# Altium PCB Atrium_Charging_Case.PcbDoc
Units mm, origin at the board's own origin, x right, y up, seen from the top; angles counter-clockwise.
Board outline 47.2 x 34.93 mm, 2 copper layers (Top Layer, Bottom Layer), stack 0.78 mm thick; 59 components, 41 nets, 194 pads, 115 vias.
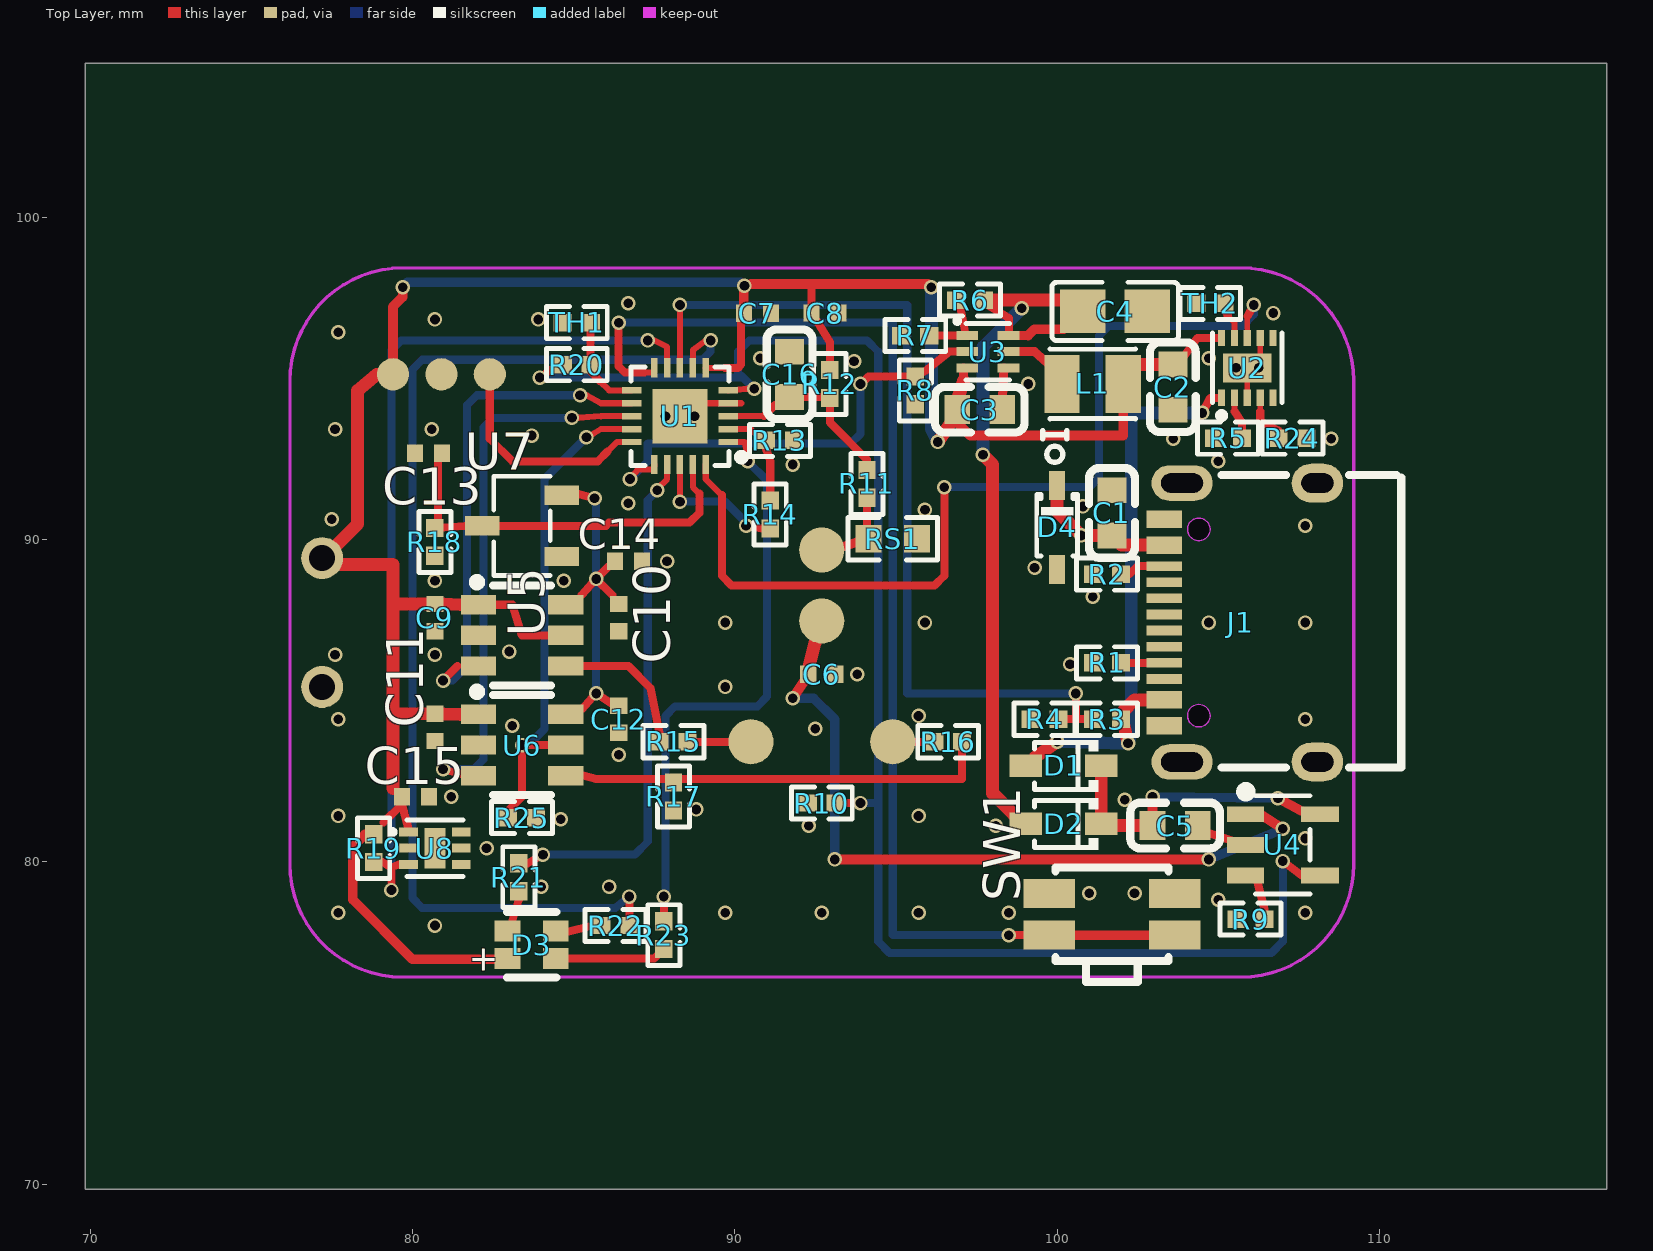
[diagram p0: Top Layer view]
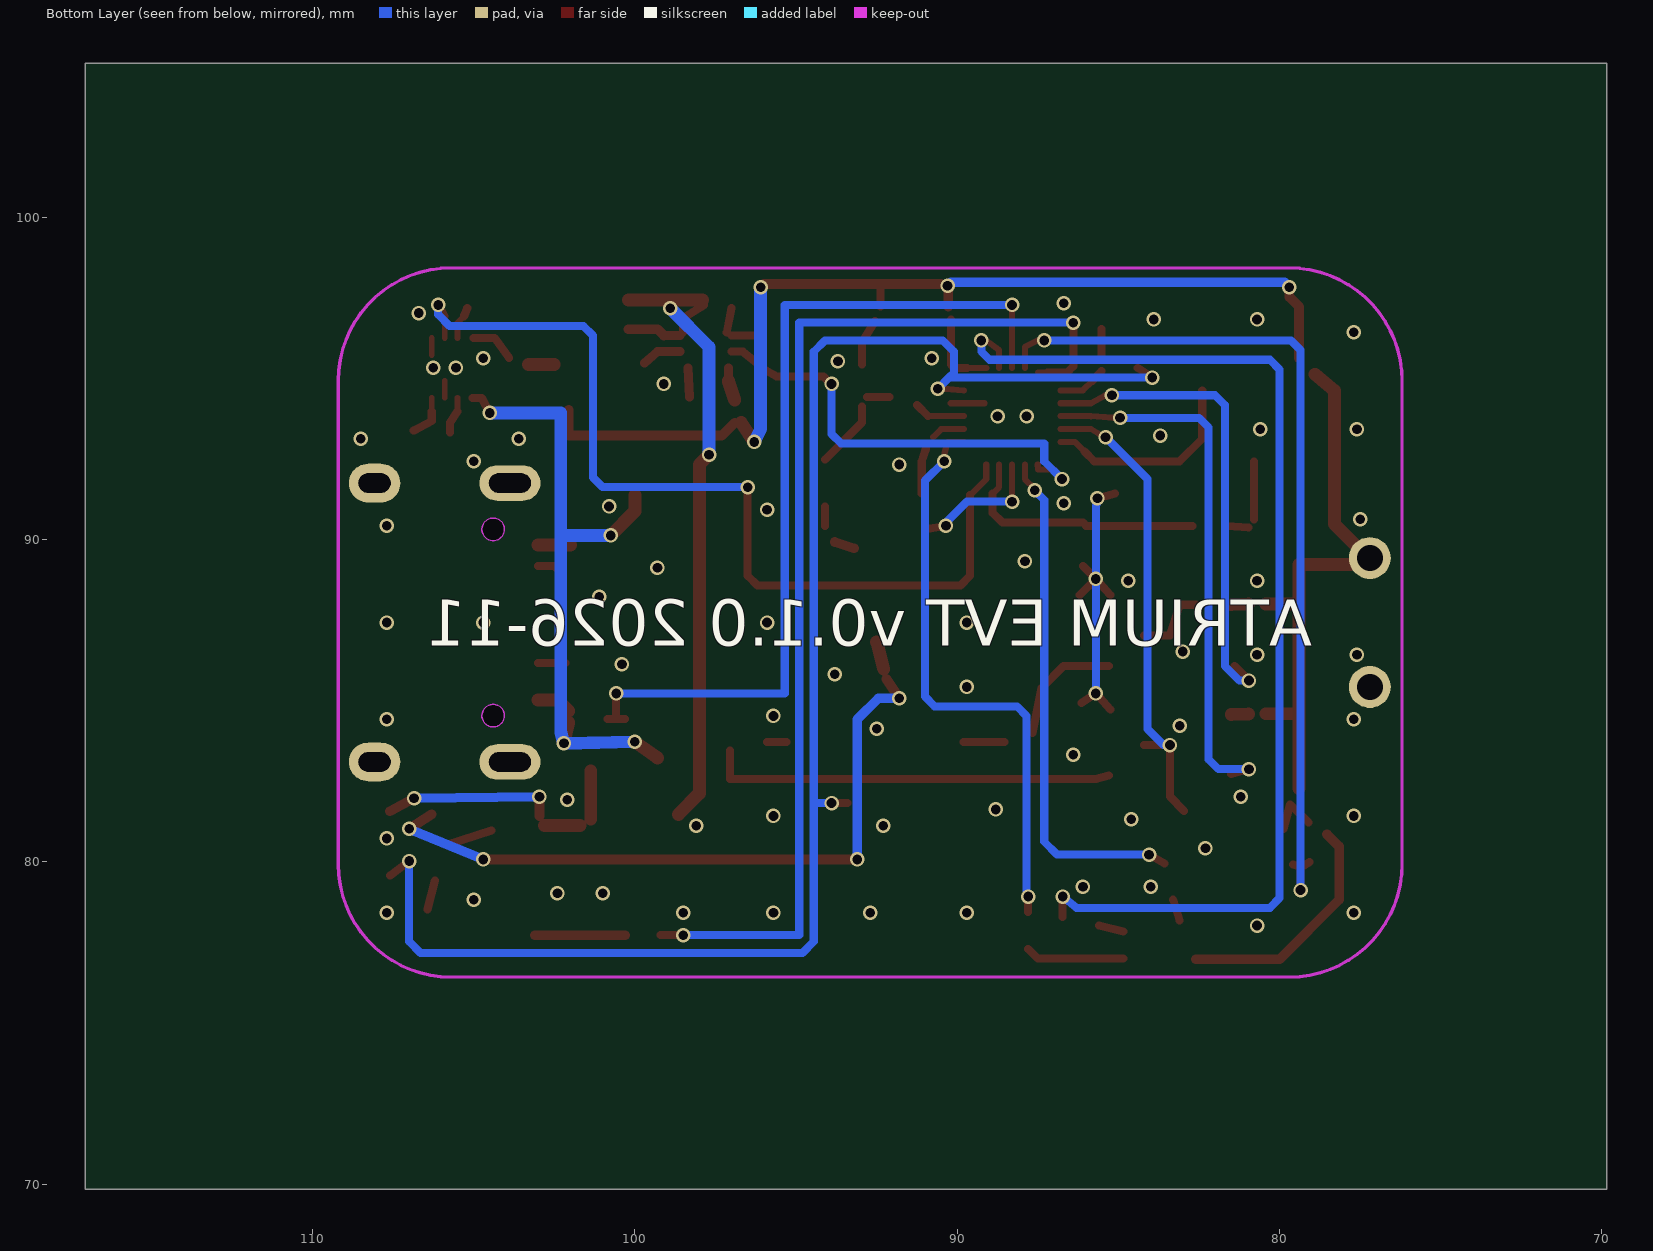
[diagram p1: Bottom Layer view, seen from below]

## Layer stack, top to bottom
Top Solder Mask Layer: solder mask 0.01, Dk 3.3
Top Layer: signal copper 0.035
Dielectric1: surface 0.71, FR4, Dk 4.5
Bottom Layer: signal copper 0.035
Bottom Solder Mask Layer: solder mask 0.01, Dk 3.3

## Board outline
117.051,69.85 69.85,69.85 69.85,104.775 117.051,104.775

## Design rules (kind name [scope] priority, off if disabled: settings)
BoardOutlineClearance copperThickness1oz [All] p0: genericclearance=0.254 ignorepadtopadclearanceinfootprint=FALSE except(0: Arc-SplitContinuation Track-SplitContinuation SMDPad-SplitContinuation THPad-SplitContinuation Via-SplitContinuation Fill-SplitContinuation Poly-SplitContinuation Region-SplitContinuation Text-SplitContinuation)
BoardOutlineClearance copperThickness2oz [All] p0: genericclearance=0.254 ignorepadtopadclearanceinfootprint=FALSE except(0: Arc-SplitContinuation Track-SplitContinuation SMDPad-SplitContinuation THPad-SplitContinuation Via-SplitContinuation Fill-SplitContinuation Poly-SplitContinuation Region-SplitContinuation Text-SplitContinuation)
BoardOutlineClearance otherClearance [All] p0: genericclearance=0.254 ignorepadtopadclearanceinfootprint=FALSE except(0: Arc-SplitContinuation Track-SplitContinuation SMDPad-SplitContinuation THPad-SplitContinuation Via-SplitContinuation Fill-SplitContinuation Poly-SplitContinuation Region-SplitContinuation Text-SplitContinuation)
Clearance copperThickness1oz [All] p1: gap=0.178 ignorepadtopadclearanceinfootprint=FALSE
Clearance copperThickness2oz [All] p1: gap=0.178 ignorepadtopadclearanceinfootprint=FALSE
Clearance otherClearance [All] p1: gap=0.178 ignorepadtopadclearanceinfootprint=FALSE
DiffPairsRouting differentialPair [All] p1: maxuncoupledlength=10 minlimit=6 maxlimit=Infinity mostfreqgap=6 toplayer_minwidth=5 toplayer_prefwidth=10 toplayer_maxwidth=100 bottomlayer_minwidth=5 bottomlayer_prefwidth=10 bottomlayer_maxwidth=100
PasteMaskExpansion pasteMaskExpansion [All] p1: expansion=0
PlaneConnect innerPlane [All] p1: planeconnectstyle=Relief reliefexpansion=0.508 reliefentries=4 reliefconductorwidth=0.15 reliefairgap=0.15
PolygonConnect copperRegion [All] p1: connectstyle=Direct reliefentries=4 reliefconductorwidth=10 polygonreliefangle="90 Angle" airgapwidth=10
RoutingVias viaSize [All] p1: viastyle="Through Hole" holewidth=7.874 minholewidth=7.874 maxholewidth=248.0314 width=7.874 minwidth=7.874 maxwidth=248.0314
SolderMaskExpansion solderMaskExpansion [IsVia] p1: useseparateexpansions=TRUE expansion=-1000 expansionbottom=-1000
SolderMaskExpansion solderMaskExpansion [All] p2: useseparateexpansions=TRUE expansion=2 expansionbottom=2
Width copperThickness1oz [All] p1: maxlimit=100 minlimit=6 preferedwidth=6
Width copperThickness2oz [All] p1: maxlimit=100 minlimit=8 preferedwidth=10

## Components (designator, comment, footprint, x,y, rotation, side; value= is the part's Value field where it differs from the comment)
C1 "10uF" C0603 101.701,90.826 r90 top
C2 "4.7uF" C0603 103.59,94.726 r270 top
C3 "10uF" C0603 97.6,94.025 r0 top
C4 "22uF" C0805 101.8,97.075 r0 top
C5 "10uF" C0603 103.66,81.126 r0 top
C6 "1uF" C0402 92.7,85.825 r0 top
C7 "100nF" C0402 90.7,97.025 r0 top
C8 "1uF" C0402 92.8,97.025 r0 top
C9 "100nF" C0402 80.7,87.576 r270 top
C10 "100nF" C0402 86.401,87.575 r270 top
C11 "100nF" C0402 80.7,84.175 r270 top
C12 "100nF" C0402 86.399,84.424 r270 top
C13 "1uF" C0402 80.501,92.676 r180 top
C14 "1uF" C0402 86.7,89.327 r0 top
C15 "100nF" C0402 80.1,82.025 r0 top
C16 "100pF" C0603 91.7,95.125 r90 top
D1 "1N5819WS" SOD-323_L1.8-W1.3-LS2.5-RD 100.2,82.975 r180 top
D2 "1N5819WS" SOD-323_L1.8-W1.3-LS2.5-RD 100.2,81.176 r180 top
D3 "XL-1615RGBC-RF" LED-ARRAY-SMD_4P-L1.6-W1.5-BR_XL-1615RGBC-RF 83.7,77.425 r180 top
D4 "TSD05DYFR" SOD-323_L1.7-W1.3-LS2.6_DYF0002A 100.001,90.375 r270 top
J1 "TYPE-C 16PIN 2MD(073)" USB-C-SMD_TYPE-C-16PIN-2MD-073 105.7,87.425 r90 top
L1 "1uH" IND-SMD_L2.5-W2.0_WPN252012H 101.1,94.825 r180 top
R1 "5.1kΩ" R0402 101.55,86.175 r180 top
R2 "5.1kΩ" R0402 101.55,88.925 r180 top
R3 "2.2kΩ" R0402 101.55,84.425 r180 top
R4 "2.2kΩ" R0402 99.61,84.425 r180 top
R5 "2.7kΩ" R0402 105.301,93.145 r180 top
R6 "768kΩ" R0402 97.3,97.426 r180 top
R7 "100kΩ" R0402 95.6,96.326 r180 top
R8 "1MΩ" R0402 95.601,94.626 r270 top
R9 "15kΩ" R0402 106,78.224 r180 top
R10 "1MΩ" R0402 92.7,81.826 r180 top
R11 "10kΩ" R0402 94.101,91.726 r90 top
R12 "1.5MΩ" R0402 92.949,94.825 r270 top
R13 "1kΩ" R0402 91.401,93.074 r0 top
R14 "20kΩ" R0402 91.099,90.775 r270 top
R15 "100Ω" R0402 88.1,83.726 r0 top
R16 "100Ω" R0402 96.62,83.726 r180 top
R17 "1MΩ" R0402 88.1,82.026 r270 top
R18 "1MΩ" R0402 80.699,89.926 r270 top
R19 "330kΩ" R0402 78.8,80.426 r270 top
R20 "100kΩ" R0402 85.1,95.424 r0 top
R21 "1kΩ" R0402 83.301,79.525 r270 top
R22 "330Ω" R0402 86.301,78.026 r180 top
R23 "330Ω" R0402 87.799,77.726 r270 top
R24 "2kΩ" R0402 107.3,93.145 r0 top
R25 "100kΩ" R0402 83.399,81.375 r0 top
RS1 "1Ω" R0603 94.9,90.025 r0 top
SW1 "SKSCLAE010" SW-SMD_4P-L3.5-W2.9-P1.30-LS4.8 101.7,78.375 r0 top
TH1 "NCU15WF104F6SRC" R0402 85.1,96.727 r180 top
TH2 "NCP15XH103F03RC" R0402 104.75,97.325 r180 top
U1 "CH32V003F4U6" QFN-20_L3.0-W3.0-P0.40-TL-EP1.7 88.3,93.825 r180 top
U2 "BQ24040DSQR" WSON-10_L2.0-W2.0-P0.40-BL-EP 105.9,95.325 r0 top
U3 "TPS61023DRLR" SOT-563-6_L1.6-W1.2-P0.5-LS1.6-BR 97.851,95.826 r180 top
U4 "SY6280AAC" SOT-23-5_L3.0-W1.7-P0.95-LS2.8-BL 106.995,80.526 r270 top
U5 "SN74LVC1T45DBVR" SOT-23-6_L2.9-W1.6-P0.95-LS2.8-BR 83.4,87.025 r180 top
U6 "SN74LVC1T45DBVR" SOT-23-6_L2.9-W1.6-P0.95-LS2.8-BR 83.4,83.625 r180 top
U7 "XC6206P182MR" SOT-23-3_L2.9-W1.6-P1.90-LS2.8-BR 83.4,90.425 r0 top
U8 "HAL248 SW" DFN-6_HAL248_SW 80.7,80.425 r270 top

## Footprints (in the part's own frame and the unit in brackets; to place one, negate y for a bottom-side part, rotate by r counter-clockwise, add the part's x,y. Pads: shape width x height; smd on the part's side, far side on the other; paste and mask are expansions set on the pad)
C0402 [mm]
  rect 0.5x0.54 smd paste+0 mask+0.051: 1(-0.42,0) 2(0.42,0)
C0603 [mm]
  rect 0.8x0.9 smd: 1(-0.7,0) 2(0.7,0)
  silkscreen extent -1.39,-0.71 1.39,0.71
C0805 [mm]
  rect 1.41x1.35 smd paste-100 mask+0.051: 1(-1,0) 2(1,0)
  silkscreen extent -1.96,-0.9 1.96,0.9
DFN-6_HAL248_SW [mm]
  rect 0.28x0.585 smd paste+0 mask+0.051: 1(-0.5,-0.818) 2(0,0.817) 3(0.5,-0.818) 4(0.5,0.817) 5(0,-0.818) 6(-0.5,0.817)
  rect 1.26x0.65 smd paste+0 mask+0.051: 7(0,0)
  silkscreen extent -0.88,-1.39 0.88,0.88
IND-SMD_L2.5-W2.0_WPN252012H [mm]
  rect 1.1x1.8 smd: 1(-0.95,0) 2(0.95,0)
  silkscreen extent -1.33,-1.09 1.33,1.09
LED-ARRAY-SMD_4P-L1.6-W1.5-BR_XL-1615RGBC-RF [mm]
  rect 0.8x0.65 smd paste+0 mask+0.05: 1(0.75,-0.425) 2(0.75,0.425) 3(-0.75,0.425) 4(-0.75,-0.425)
  silkscreen extent -0.76,-1.02 0.76,1.02
QFN-20_L3.0-W3.0-P0.40-TL-EP1.7 [mm]
  rect 0.6x0.2 smd paste-100 mask+0.051: 1(-1.5,0.8) 2(-1.5,0.4) 3(-1.5,0) 4(-1.5,-0.4) 5(-1.5,-0.8) 11(1.5,-0.8) 12(1.5,-0.4) 13(1.5,0) 14(1.5,0.4) 15(1.5,0.8)
  rect 0.2x0.6 smd paste-100 mask+0.051: 6(-0.8,-1.5) 7(-0.4,-1.5) 8(0,-1.5) 9(0.4,-1.5) 10(0.8,-1.5) 16(0.8,1.5) 17(0.4,1.5) 18(0,1.5) 19(-0.4,1.5) 20(-0.8,1.5)
  rect 1.7x1.7 smd paste-100 mask+0.051: 21(0,0)
  silkscreen extent -2,-1.52 1.52,1.52
R0402 [mm]
  rect 0.566x0.54 smd paste-100 mask+0.051: 1(-0.433,0) 2(0.433,0)
  silkscreen extent -0.94,-0.5 0.94,0.5
R0603 [mm]
  rect 0.806x0.864 smd paste-100 mask+0.051: 1(-0.753,0) 2(0.753,0)
  silkscreen extent -1.39,-0.66 1.39,0.66
SOD-323_L1.7-W1.3-LS2.6_DYF0002A [mm]
  rect 0.9x0.5 smd paste+0 mask+0.05: 1(-1.3,0) 2(1.3,0)
  silkscreen extent -3.08,-0.64 0.89,0.64
SOD-323_L1.8-W1.3-LS2.5-RD [mm]
  rect 1x0.7 smd: 1(-1.172,0) 2(1.172,0)
  silkscreen extent -1.08,-0.8 0.9,0.8
SOT-23-3_L2.9-W1.6-P1.90-LS2.8-BR [mm]
  rect 1.07x0.6 smd paste+0 mask+0.051: 1(1.235,-0.95) 2(1.235,0.95) 3(-1.235,0)
  silkscreen extent -0.88,-1.54 0.88,1.54
SOT-23-5_L3.0-W1.7-P0.95-LS2.8-BL [mm]
  rect 0.49x1.157 smd: 1(-0.95,-1.154) 2(0,-1.154) 3(0.95,-1.154)
  rect 0.49x1.175 smd: 4(0.95,1.154) 5(-0.95,1.154)
  silkscreen extent -1.8,-1.29 1.53,0.85
SOT-23-6_L2.9-W1.6-P0.95-LS2.8-BR [mm]
  rect 1.1x0.6 smd paste+0 mask+0.051: 1(1.35,-0.95) 2(1.35,0) 3(1.35,0.95) 4(-1.35,0.95) 5(-1.35,0) 6(-1.35,-0.95)
  silkscreen extent -0.9,-1.78 1.52,1.55
SOT-563-6_L1.6-W1.2-P0.5-LS1.6-BR [mm]
  rect 0.68x0.28 smd: 1(0.64,-0.5) 2(0.64,0) 3(0.64,0.5) 4(-0.64,0.5) 5(-0.64,0) 6(-0.64,-0.5)
  silkscreen extent -0.68,-1.02 1.02,0.88
SW-SMD_4P-L3.5-W2.9-P1.30-LS4.8 [mm]
  rect 1.6x0.9 smd: 1(-1.95,-0.65) 2(1.95,-0.65) 3(-1.95,0.65) 4(1.95,0.65)
  silkscreen extent -1.75,-2.1 1.75,1.45
USB-C-SMD_TYPE-C-16PIN-2MD-073 [mm]
  oval 1.2x1.6 hole 0.6 slot 1 at 90 deg paste+0 mask+0.05: 13(-4.325,-2.375) 14(4.325,-2.375)
  oval 1.1x1.9 hole 0.6 slot 1.3 at 90 deg paste+0 mask+0.05: 13(-4.325,1.825) 14(4.325,1.825)
  rect 0.55x1.1 smd paste+0 mask+0.05: A1B12(-3.2,2.375) A4B9(-2.4,2.375) B1A12(3.2,2.375) B4A9(2.4,2.375)
  rect 0.3x1.1 smd paste+0 mask+0.05: A5(-1.25,2.375) A6(-0.25,2.375) A7(0.25,2.375) A8(1.25,2.375) B5(1.75,2.375) B6(0.75,2.375) B7(-0.75,2.375) B8(-1.75,2.375)
  Board Outline Layer circle w0.003: c-2.89,1.305 r0.35
  Board Outline Layer circle w0.003: c2.89,1.305 r0.35
  Board Outline Layer region: -2.89,0.955 -3.042,0.99 -3.164,1.087 -3.231,1.227 -3.231,1.383 -3.164,1.523 -3.042,1.62 -2.89,1.655 -2.89,1.655 -2.738,1.62 -2.616,1.523 -2.549,1.383 -2.549,1.227 -2.616,1.087 -2.738,0.99 -2.89,0.955
  Board Outline Layer region: -2.89,0.955 -2.968,0.964 -3.042,0.99 -3.108,1.031 -3.164,1.087 -3.205,1.153 -3.231,1.227 -3.24,1.305 -3.231,1.383 -3.205,1.457 -3.164,1.523 -3.108,1.579 -3.042,1.62 -2.968,1.646 -2.89,1.655 -2.812,1.646 -2.738,1.62 -2.672,1.579 -2.616,1.523 -2.575,1.457 -2.549,1.383 -2.54,1.305 -2.549,1.227 -2.575,1.153 -2.616,1.087 -2.672,1.031 -2.738,0.99 -2.812,0.964
  Board Outline Layer region: 2.89,0.955 2.738,0.99 2.616,1.087 2.549,1.227 2.549,1.383 2.616,1.523 2.738,1.62 2.89,1.655 2.89,1.655 3.042,1.62 3.164,1.523 3.231,1.383 3.231,1.227 3.164,1.087 3.042,0.99 2.89,0.955
  Board Outline Layer region: 2.89,0.955 2.812,0.964 2.738,0.99 2.672,1.031 2.616,1.087 2.575,1.153 2.549,1.227 2.54,1.305 2.549,1.383 2.575,1.457 2.616,1.523 2.672,1.579 2.738,1.62 2.812,1.646 2.89,1.655 2.968,1.646 3.042,1.62 3.108,1.579 3.164,1.523 3.205,1.457 3.231,1.383 3.24,1.305 3.231,1.227 3.205,1.153 3.164,1.087 3.108,1.031 3.042,0.99 2.968,0.964
  Multi-Layer board cut-out: -2.89,0.955 -3.042,0.99 -3.164,1.087 -3.231,1.227 -3.231,1.383 -3.164,1.523 -3.042,1.62 -2.89,1.655 -2.89,1.655 -2.738,1.62 -2.616,1.523 -2.549,1.383 -2.549,1.227 -2.616,1.087 -2.738,0.99 -2.89,0.955
  Multi-Layer board cut-out: 2.89,0.955 2.738,0.99 2.616,1.087 2.549,1.227 2.549,1.383 2.616,1.523 2.738,1.62 2.89,1.655 2.89,1.655 3.042,1.62 3.164,1.523 3.231,1.383 3.231,1.227 3.164,1.087 3.042,0.99 2.89,0.955
  silkscreen extent -4.5,-4.97 4.57,0.6
WSON-10_L2.0-W2.0-P0.40-BL-EP [mm]
  rect 0.224x0.505 smd: 1(-0.8,-0.928) 2(-0.4,-0.928) 3(0,-0.928) 4(0.4,-0.928) 5(0.8,-0.928) 6(0.8,0.928) 7(0.4,0.928) 8(0,0.928) 9(-0.4,0.928) 10(-0.8,0.928)
  rect 1.5x0.9 smd: 11(0,0)
  silkscreen extent -1.08,-1.58 1.08,1.08

## Free pads (board coordinates)
  round 1.3 hole 0.8: BT1(77.2,89.425) BT2(77.2,85.425)
  round 1.4 smd: P1(92.7,87.475) P2(92.7,89.675) P3(94.9,83.725) P4(90.5,83.725)
  round 1.001 smd paste+0 mask+0.051: TP1(82.4,95.125)
  round 1 smd: TP2(79.4,95.125) TP3(80.9,95.125)

## Via types
v1: diameter 0.45, hole 0.3, Top Layer to Bottom Layer, 115 vias

## Nets (pads, with @x,y where several pads share a name; then routed paths per layer and width w, separated by ;. In a path a pad name is that pad's centre, name@x,y a point inside that pad or via, vN(x,y) a via of type N, cw(c..) or ccw(c..) an arc to the next point about the centre after c; other vN are vias at no path point)
5V_POD: C5.1 D1.1 D2.1 U4.5 | length 7.9
  Top Layer w0.3: C5.1@102.96,81.425 v1(102.96,82.025) ; v1(106.85,81.975) U4.5@107.6,81.575
  Top Layer w0.4: D2.1@101.37,81.325 D1.1@101.37,82.825 ; D2.1@101.7,81.125 C5.1@102.8,81.125
  Bottom Layer w0.3: v1(102.96,82.025) v1(106.85,81.975)
BOOST_EN: R8.1 U1.16 U3.2 | length 14.1
  Top Layer w0.19: v1(86.75,91.875) 87,92.175 87.5,92.175 U1.16
  Top Layer w0.25: v1(93.9,94.825) 94.15,95.055 95.6,95.055 95.9,95.225 96.65,95.825 U3.2@97,95.825
  Bottom Layer w0.25: v1(86.75,91.875) 87.3,92.425 87.3,92.975 93.6,92.975 93.9,93.275 v1(93.9,94.825)
BOOST_FB: R6.2 R7.1 U3.1 | length 1.6
  Top Layer w0.25: R7.1@96.2,96.325 U3.1@97,96.325 ; R6.2@97,97.175 U3.1@97.15,96.425
BOOST_OUT: C4.1 D2.2 R6.1 U3.6 | length 21.8
  Top Layer w0.25: R6.1@97.85,97.275 98.5,96.875 U3.6@98.5,96.425
  Top Layer w0.28: U3.6@98.6,96.325 99.1,96.325
  Top Layer w0.3: 99.1,96.325 99.3,96.525 C4.1@100.2,96.525
  Top Layer w0.4: v1(97.7,92.625) 98,92.325 98,82.125 D2.2@98.65,81.475 ; R6.1@97.9,97.425 C4.1@100.2,97.425
  Bottom Layer w0.4: v1(97.7,92.625) 97.7,95.975 v1(98.9,97.175)
BOOST_SW: L1.2 U3.5 | length 1.2
  Top Layer w0.28: U3.5@98.6,95.825 99.3,95.825 L1.2@99.7,95.475
BTN: SW1.1 SW1.2 U1.10 | length 37.1
  Top Layer w0.19: 87.2,95.175 U1.10@87.5,95.175
  Top Layer w0.25: v1(86.4,96.725) 86.4,95.375 86.6,95.175 87.2,95.175 ; v1(98.5,77.725) SW1.1@99.2,77.725
  Top Layer w0.3: SW1.1@100.3,77.725 SW1.2@103.1,77.725
  Bottom Layer w0.25: v1(86.4,96.725) 94.9,96.725 94.9,77.725 v1(98.5,77.725)
CC1: J1.A5 R1.1 | length 0.9
  Top Layer w0.25: R1.1@102.15,86.175 J1.A5@103,86.175
CC2: J1.B5 R2.1 | length 0.9
  Top Layer w0.25: R2.1@102.25,88.925 102.5,89.175 J1.B5@103,89.175
CHG_ISET: R5.1 U2.2 | length 1.1
  Top Layer w0.175: 105.5,93.975 U2.2@105.501,94.398
  Top Layer w0.25: 105.5,93.975 105.73,93.625 R5.1@105.73,93.325
CHG_PRETERM: R24.1 U2.4 | length 1.4
  Top Layer w0.175: 106.3,93.975 U2.4@106.301,94.398
  Top Layer w0.25: 106.3,93.975 106.3,93.675 R24.1@106.87,93.375
CHG_TS: TH2.1 U2.9 | length 1
  Top Layer w0.175: 105.3,96.925 105.5,96.725 U2.9
  Top Layer w0.25: TH2.1@105.2,97.175 105.3,96.925
CHRG: U1.20 U2.8 | length 29.3
  Top Layer w0.175: U2.8 105.9,96.925
  Top Layer w0.19: U1.20 89.1,91.875 89.6,91.375
  Top Layer w0.25: 89.6,91.375 89.6,88.875 89.9,88.575 96.2,88.575 96.5,88.875 v1(96.5,91.625) ; 105.9,96.925 v1(106.1,97.275)
  Bottom Layer w0.25: v1(96.5,91.625) 101,91.625 101.3,91.925 101.3,96.325 101.6,96.625 105.75,96.625 106.1,96.975 v1(106.1,97.275)
GND: C1.2 C2.2 C3.2 C4.2 C5.2 C6.2 C7.2 C8.2 C9.2 C10.2 C11.2 C12.2 C13.2 C14.2 C15.2 C16.2 D4.2 J1.13 J1.14 J1.A1B12 J1.B1A12 pad.BT2 pad.TP3 R1.2 R2.2 R4.2 R5.2 R7.2 R8.2 R9.2 R10.2 R13.2 R17.2 R18.2 R24.2 R25.2 RS1.2 SW1.3 SW1.4 TH1.2 TH2.2 U1.4 U1.21 U2.3 U2.7 U2.11 U3.4 U4.2 U5.2 U6.2 U7.1 U8.2 | length 4.5
  Top Layer w0.175: U2.3@105.9,94.398 U2.11@105.9,94.925 ; U2.11@106.3,95.725 U2.7
  Top Layer w0.19: U1.21@89.15,94.225 U1.4 90.2,94.225
  Top Layer w0.25: C5.2@104.45,80.975 U4.2@105.84,80.525
  Top Layer w0.28: C3.2@98.3,94.425 U3.4@98.35,95.325
  other v1: 80.7,78.025 77.7,78.425 89.7,78.425 92.7,78.425 95.7,78.425 98.5,78.425 107.7,78.425 105,78.825 101,79.025 102.4,79.025 84,79.225 86.1,79.225 82.3,80.425 107.7,80.725 92.3,81.125 98.1,81.125 84.6,81.325 77.7,81.425 95.7,81.425 88.8,81.625 102.1,81.925 81.2,82.025 86.4,83.325 92.5,84.125 83.1,84.225 77.7,84.425 107.7,84.425 95.7,84.525 89.7,85.425 93.8,85.825 100.4,86.125 77.6,86.425 80.7,86.425 83,86.525 89.7,87.425 95.9,87.425 104.7,87.425 107.7,87.425 101.1,88.225 80.7,88.725 84.7,88.725 99.3,89.125 87.9,89.325 107.7,90.425 77.5,90.625 95.9,90.925 100.8,91.025 86.7,91.125 91.8,92.325 105,92.425 103.6,93.125 108.5,93.125 83.7,93.225 77.6,93.425 80.6,93.425 87.85,93.825 88.75,93.825 99.1,94.825 105.55,95.325 106.25,95.325 93.7,95.525 90.79,95.625 104.7,95.625 77.7,96.425 80.7,96.825 83.9,96.825 106.7,97.025 86.7,97.325
ISET: R9.1 U4.3 | length 0.9
  Top Layer w0.25: U4.3@106.2,79.425 106.43,78.525
LDO_PWR: C13.1 R18.1 U1.19 U7.3 | length 10.4
  Top Layer w0.19: U1.19 88.7,91.625 88.9,91.425
  Top Layer w0.25: R18.1@80.8,90.625 C13.1@80.8,92.425 ; 80.97,90.375 U7.3@81.63,90.425 ; 82.7,90.425 86,90.425 86.1,90.525 88.6,90.525 88.9,90.825 88.9,91.425
LED_B: R23.1 U1.1 | length 17.9
  Top Layer w0.19: U1.1@89.799,93.026 90.3,93.025 90.4,92.675
  Top Layer w0.25: 87.8,78.445 v1(87.8,78.925)
  Bottom Layer w0.25: v1(87.8,78.925) 87.85,79.125 87.85,84.525 88.15,84.825 90.7,84.825 91,85.125 91,91.825 v1(90.4,92.425)
LED_BK: D3.3 R23.2 | length 3.1
  Top Layer w0.25: 84.85,77.005 87.5,77.005 R23.2@87.8,77.295
LED_G: R22.1 U1.7 | length 34.9
  Top Layer w0.19: U1.7@88.7,95.324 88.7,95.875 v1@89.1,96.175
  Top Layer w0.25: R22.1@86.73,78.295 v1(86.73,78.925)
  Bottom Layer w0.25: v1(86.73,78.925) 86.3,78.575 80.3,78.575 80,78.875 80,95.275 80.3,95.575 89,95.575 89.25,95.825 v1(89.25,96.175)
LED_GK: D3.4 R22.2 | length 0.8
  Top Layer w0.25: 84.85,77.845 R22.2@85.6,78.025
LED_R: R21.1 U1.17 | length 15.9
  Top Layer w0.19: v1@87.6,91.575 87.9,91.875 U1.17
  Top Layer w0.25: R21.1@83.57,79.955 v1(84.05,80.225)
  Bottom Layer w0.25: v1(84.05,80.225) 86.9,80.225 87.3,80.625 87.3,91.225 v1(87.6,91.525)
LED_RK: D3.1 R21.2 | length 0.7
  Top Layer w0.25: 83.1,78.175 R21.2@83.3,78.825
LID: R19.2 U1.9 U8.3 | length 27.2
  Top Layer w0.19: v1@87.5,96.175 87.9,95.975 U1.9@87.899,95.324
  Top Layer w0.25: 79.07,79.995 79.35,79.825 ; v1(79.35,79.125) 79.35,79.825 ; U8.3@79.59,79.925 79.35,79.825
  Bottom Layer w0.25: v1(79.35,79.125) 79.35,95.875 79.65,96.175 v1(87.3,96.175)
NTC_ADC: R20.2 TH1.1 U1.11 | length 2.4
  Top Layer w0.19: 85.8,94.925 86.1,94.625 U1.11
  Top Layer w0.25: R20.2@85.53,95.225 85.8,94.925 ; R20.2@85.53,95.625 TH1.1@85.53,96.525
OPA_N: R13.1 R14.1 U1.2 | length 2.5
  Top Layer w0.19: U1.2@89.799,93.424 90.5,93.425 R13.1@90.75,93.175
  Top Layer w0.25: R13.1@90.97,92.825 91.1,92.425 R14.1@91.1,91.425
OPA_OUT: R14.2 U1.18 | length 4.1
  Top Layer w0.19: v1(88.3,91.175) U1.18
  Top Layer w0.25: v1(90.35,90.425) R14.2@90.85,90.345
  Bottom Layer w0.25: v1(88.3,91.175) 89.7,91.175 90.35,90.525 v1(90.35,90.425)
OPA_P: C16.1 R11.2 R12.2 U1.3 | length 4.4
  Top Layer w0.19: U1.3@89.799,93.826 90.9,93.825
  Top Layer w0.25: 90.9,93.825 91.25,94.175 ; C16.1@92.1,94.425 R12.2@92.8,94.425 ; R12.2@92.95,94.125 92.95,93.625 94.1,92.475
POGO_GND: pad.P2 R11.1 RS1.1 | length 1.2
  Top Layer w0.25: RS1.1@94.1,90.425 R11.1@94.1,91.025
  Top Layer w0.3: pad.P2@93.2,89.725 RS1.1@93.8,89.925
POGO_SWDCLK: pad.P4 R15.2 | length 1.3
  Top Layer w0.25: R15.2@88.53,83.725 pad.P4@89.8,83.725
POGO_SWDIO: pad.P3 R16.2 | length 0.6
  Top Layer w0.25: pad.P3@95.3,83.725 95.9,83.725
POGO_VIN: C6.1 pad.P1 U4.1 | length 22.4
  Top Layer w0.3: v1(91.8,85.075) C6.1@92.2,85.675 ; v1(93.1,80.075) v1(104.7,80.075) ; U4.1@106.3,81.475 v1(107,81.025)
  Top Layer w0.4: C6.1@92.28,85.975 pad.P1@92.5,86.825
  Bottom Layer w0.3: v1(91.8,85.075) 92.45,85.075 93.1,84.425 v1(93.1,80.075) ; v1(104.7,80.075) v1(107,81.025)
SWDCLK_A: U1.12 U5.3 | length 14.8
  Top Layer w0.19: v1@85.4,94.475 85.85,94.225 U1.12
  Top Layer w0.25: v1(80.95,85.625) 81.4,86.075
  Bottom Layer w0.25: v1(80.95,85.625) 81.25,85.625 81.7,86.075 81.7,94.175 82,94.475 v1(85.2,94.475)
SWDCLK_B: R15.1 U5.4 | length 3.8
  Top Layer w0.25: U5.4@85.3,86.075 86.7,86.075 87.38,85.395 R15.1@87.67,83.995
SWDIO_A: U1.13 U6.3 | length 16.8
  Top Layer w0.19: v1@85.15,93.775 85.85,93.825 U1.13@86.8,93.826
  Top Layer w0.25: v1(80.95,82.875) 81.5,82.725
  Bottom Layer w0.25: v1(80.95,82.875) 81.9,82.875 82.2,83.175 82.2,93.475 82.5,93.775 v1(84.95,93.775)
SWDIO_B: R16.1 R17.1 U6.4 | length 12.6
  Top Layer w0.25: U6.4@85.3,82.675 85.7,82.575 97.05,82.575 97.05,83.455
SWDIO_DIR: R25.1 U1.14 U6.5 | length 14.8
  Top Layer w0.19: v1@85.6,93.275 85.85,93.425 U1.14@86.8,93.424
  Top Layer w0.25: R25.1@82.97,81.575 83.4,82.025 v1(83.4,83.625) 84.2,83.625
  Bottom Layer w0.25: v1(83.4,83.625) 83.6,83.625 84.1,84.125 84.1,91.875 v1(85.4,93.175)
SWIO: pad.TP1 U1.15 | length 6.4
  Top Layer w0.19: 86.05,92.725 86.35,93.025 U1.15@86.8,93.026
  Top Layer w0.25: pad.TP1@82.4,94.625 82.4,93.125 83.1,92.425 85.75,92.425 86.05,92.725
V1V8: C10.1 C12.1 C14.1 U5.6 U6.6 U7.2 | length 9.8
  Top Layer w0.25: U7.2@85.1,91.425 v1(85.65,91.275) ; U6.6@85.25,84.725 v1(85.7,85.225) C12.1@86.15,84.925 ; 85.25,88.275 v1(85.7,88.775) ; C14.1@86.1,89.175 v1(85.7,88.775) ; 86.2,88.275 v1(85.7,88.775)
  Bottom Layer w0.25: v1(85.65,91.275) 85.7,91.025 v1(85.7,85.225)
VBUS: C1.1 D1.2 D4.1 J1.A4B9 J1.B4A9 R3.1 U2.1 | length 22.9
  Top Layer w0.25: v1(104.5,93.925) 104.75,94.395 U2.1@105.03,94.395
  Top Layer w0.4: D1.2@99.3,83.225 v1(100,83.725) ; D4.1@100,91.375 100,90.875 v1(100.75,90.125) C1.1@101.4,90.125 ; C1.1@102,89.825 J1.B4A9@103,89.825 ; R3.1@102.05,84.325 v1(102.2,83.675) ; R3.1@102.05,84.675 102.4,85.025 J1.A4B9@103,85.025
  Bottom Layer w0.4: v1(100,83.725) v1(102.2,83.675) 102.3,84.025 102.3,90.125 ; v1(100.75,90.125) 102.3,90.125 ; v1(104.5,93.925) 102.3,93.925 102.3,90.125
VBUS_DET: R3.2 R4.1 U1.8 | length 27.4
  Top Layer w0.19: U1.8@88.301,95.324 v1@88.3,97.075
  Top Layer w0.25: R4.1@100.3,84.425 100.58,84.425 ; v1(100.58,85.225) 100.58,84.425 ; R3.2@100.85,84.425 100.58,84.425
  Bottom Layer w0.25: v1(88.3,97.275) 95.35,97.275 95.35,85.225 v1(100.58,85.225)
VDD: C2.1 C3.1 C7.1 C8.1 C9.1 C11.1 C15.1 D3.2 L1.1 pad.BT1 pad.TP2 R12.1 R19.1 U1.6 U2.10 U3.3 U5.1 U5.5 U6.1 U8.1 | length 67.9
  Top Layer w0.19: U1.6 89.7,95.325
  Top Layer w0.25: 79.1,81.225 79.68,81.775 U8.1@79.88,81.025 ; 82.6,87.975 83.1,87.975 83.4,87.025 84.2,87.025 ; 89.7,95.325 90.1,95.325 90.2,95.425 C7.1@90.2,96.825 ; C8.1@92.38,97.225 92.38,97.925 ; C8.1@92.55,96.775 92.95,96.125 R12.1@92.95,95.425 ; C2.1@103.9,95.625 104.35,96.255 U2.10@105,96.255
  Top Layer w0.28: 97.1,94.925 U3.3@97.1,95.325
  Top Layer w0.3: R19.1@78.53,80.855 78.15,80.475 78.15,78.825 80,76.975 D3.2@82.6,76.975 ; pad.TP2@79.4,95.625 79.4,97.225 79.7,97.525 v1(79.7,97.825) ; C7.1@90.28,97.225 90.28,97.875 90.5,97.925 92.38,97.925 96,97.925 v1(96.1,97.825) ; C3.1@96.9,93.625 97.3,93.225 102.05,93.225 L1.1@102.05,94.025
  Top Layer w0.4: 77.7,89.875 78.3,90.475 78.3,94.625 78.9,95.125 ; pad.BT1@77.8,89.225 79.4,89.225 79.4,87.995 ; 79.4,82.275 79.4,84.595 ; C11.1@80.43,84.595 79.4,84.595 ; C9.1@80.43,87.995 79.4,87.995 ; 80.97,84.585 81.5,84.575 ; 80.97,87.995 U5.1@81.5,87.975 ; v1(96.3,93.025) C3.1@96.7,93.625 ; C3.1@96.9,94.325 97.1,94.925 ; L1.1@102.5,95.425 C2.1@103.3,95.425 ; 79.4,84.595 79.4,87.995
  Bottom Layer w0.3: v1(79.7,97.825) 79.85,97.975 90.2,97.975 v1(90.3,97.875)
  Bottom Layer w0.4: v1(96.1,97.825) 96.1,93.425 v1(96.3,93.025)
VIN_EN: R10.1 R20.1 U1.5 U4.4 | length 48.9
  Top Layer w0.19: U1.5 v1@90.4,94.675
  Top Layer w0.25: v1(83.95,95.025) R20.1@84.4,95.325 ; R10.1@93.4,81.825 v1(93.9,81.825) ; v1(107,80.025) U4.4@107.6,79.575
  Bottom Layer w0.25: v1(83.95,95.025) 90.25,95.025 ; v1(90.6,94.675) 90.25,95.025 ; v1(93.9,81.825) 94.45,81.825 ; v1(107,80.025) 107,77.525 106.65,77.175 94.8,77.175 94.45,77.525 94.45,81.825 ; 90.25,95.025 90.1,95.175 90.1,95.825 90.45,96.175 94.1,96.175 94.45,95.825 94.45,81.825
pads on no net: J1.A6 J1.A7 J1.A8 J1.B6 J1.B7 J1.B8 U2.5 U2.6 U8.4 U8.5 U8.6 U8.7

## Polygon pours and split planes (outlines as drawn)
GND on Top Layer (solid, remove dead copper, pour order 0): 76.5,94.916 76.525,95.32 76.598,95.71 76.719,96.086 76.885,96.446 77.094,96.782 77.343,97.089 77.629,97.364 77.946,97.601 78.289,97.797 78.655,97.949 79.036,98.055 79.429,98.113 105.817,98.123 106.215,98.083 106.601,97.995 106.973,97.86 107.326,97.681 107.654,97.459 107.952,97.198 108.215,96.903 108.44,96.577 108.623,96.226 108.761,95.855 108.853,95.47 108.896,95.073 108.9,79.935 108.875,79.53 108.802,79.141 108.681,78.764 108.515,78.405 108.306,78.069 108.057,77.761 107.771,77.487 107.454,77.25 107.111,77.054 106.745,76.901 106.364,76.796 105.971,76.737 79.583,76.728 79.185,76.768 78.799,76.855 78.427,76.99 78.074,77.17 77.746,77.392 77.448,77.653 77.185,77.948 76.96,78.274 76.777,78.625 76.639,78.996 76.547,79.381 76.504,79.778
GND on Bottom Layer (solid, remove dead copper, pour order 2): 76.5,94.916 76.525,95.32 76.598,95.71 76.719,96.086 76.885,96.446 77.094,96.782 77.343,97.089 77.629,97.364 77.946,97.601 78.289,97.797 78.655,97.949 79.036,98.055 79.429,98.113 105.817,98.123 106.215,98.083 106.601,97.995 106.973,97.86 107.326,97.681 107.654,97.459 107.952,97.198 108.215,96.903 108.44,96.577 108.623,96.226 108.761,95.855 108.853,95.47 108.896,95.073 108.9,79.935 108.875,79.53 108.802,79.141 108.681,78.764 108.515,78.405 108.306,78.069 108.057,77.761 107.771,77.487 107.454,77.25 107.111,77.054 106.745,76.901 106.364,76.796 105.971,76.737 79.583,76.728 79.185,76.768 78.799,76.855 78.427,76.99 78.074,77.17 77.746,77.392 77.448,77.653 77.185,77.948 76.96,78.274 76.777,78.625 76.639,78.996 76.547,79.381 76.504,79.778

## Keep-outs
Board Outline Layer:
  lines w0.102: 76.2,79.925 ccw(c79.7,79.925) 79.7,76.425 105.7,76.425 ccw(c105.7,79.925) 109.2,79.925 109.2,94.925 ccw(c105.7,94.925) 105.7,98.425 79.7,98.425 ccw(c79.7,94.925) 76.2,94.925 76.2,79.925

## Silkscreen, mask and mechanical layers (free items; w line width, h text height)
Bottom Silkscreen Layer:
  text "ATRIUM EVT v0.1.0 2026-11" at 78.994,86.71 h1.43

## Text inside footprints (layer, text, board x,y; h text height)
D3: Top Silkscreen Layer "+" at 81.743,76.626 h0.8